# Altium PCB Electrode_Ribbon_PCB_v3.0.PcbDoc (part 2 of 5)
Units mil, origin at the board's own origin, x right, y up, seen from the top; angles counter-clockwise.
Board outline 8303.83 x 5482.84 mil, 2 copper layers (Top Layer, Bottom Layer), stack 3.556 mil thick; 265 components, 171 nets, 720 pads, 346 vias.
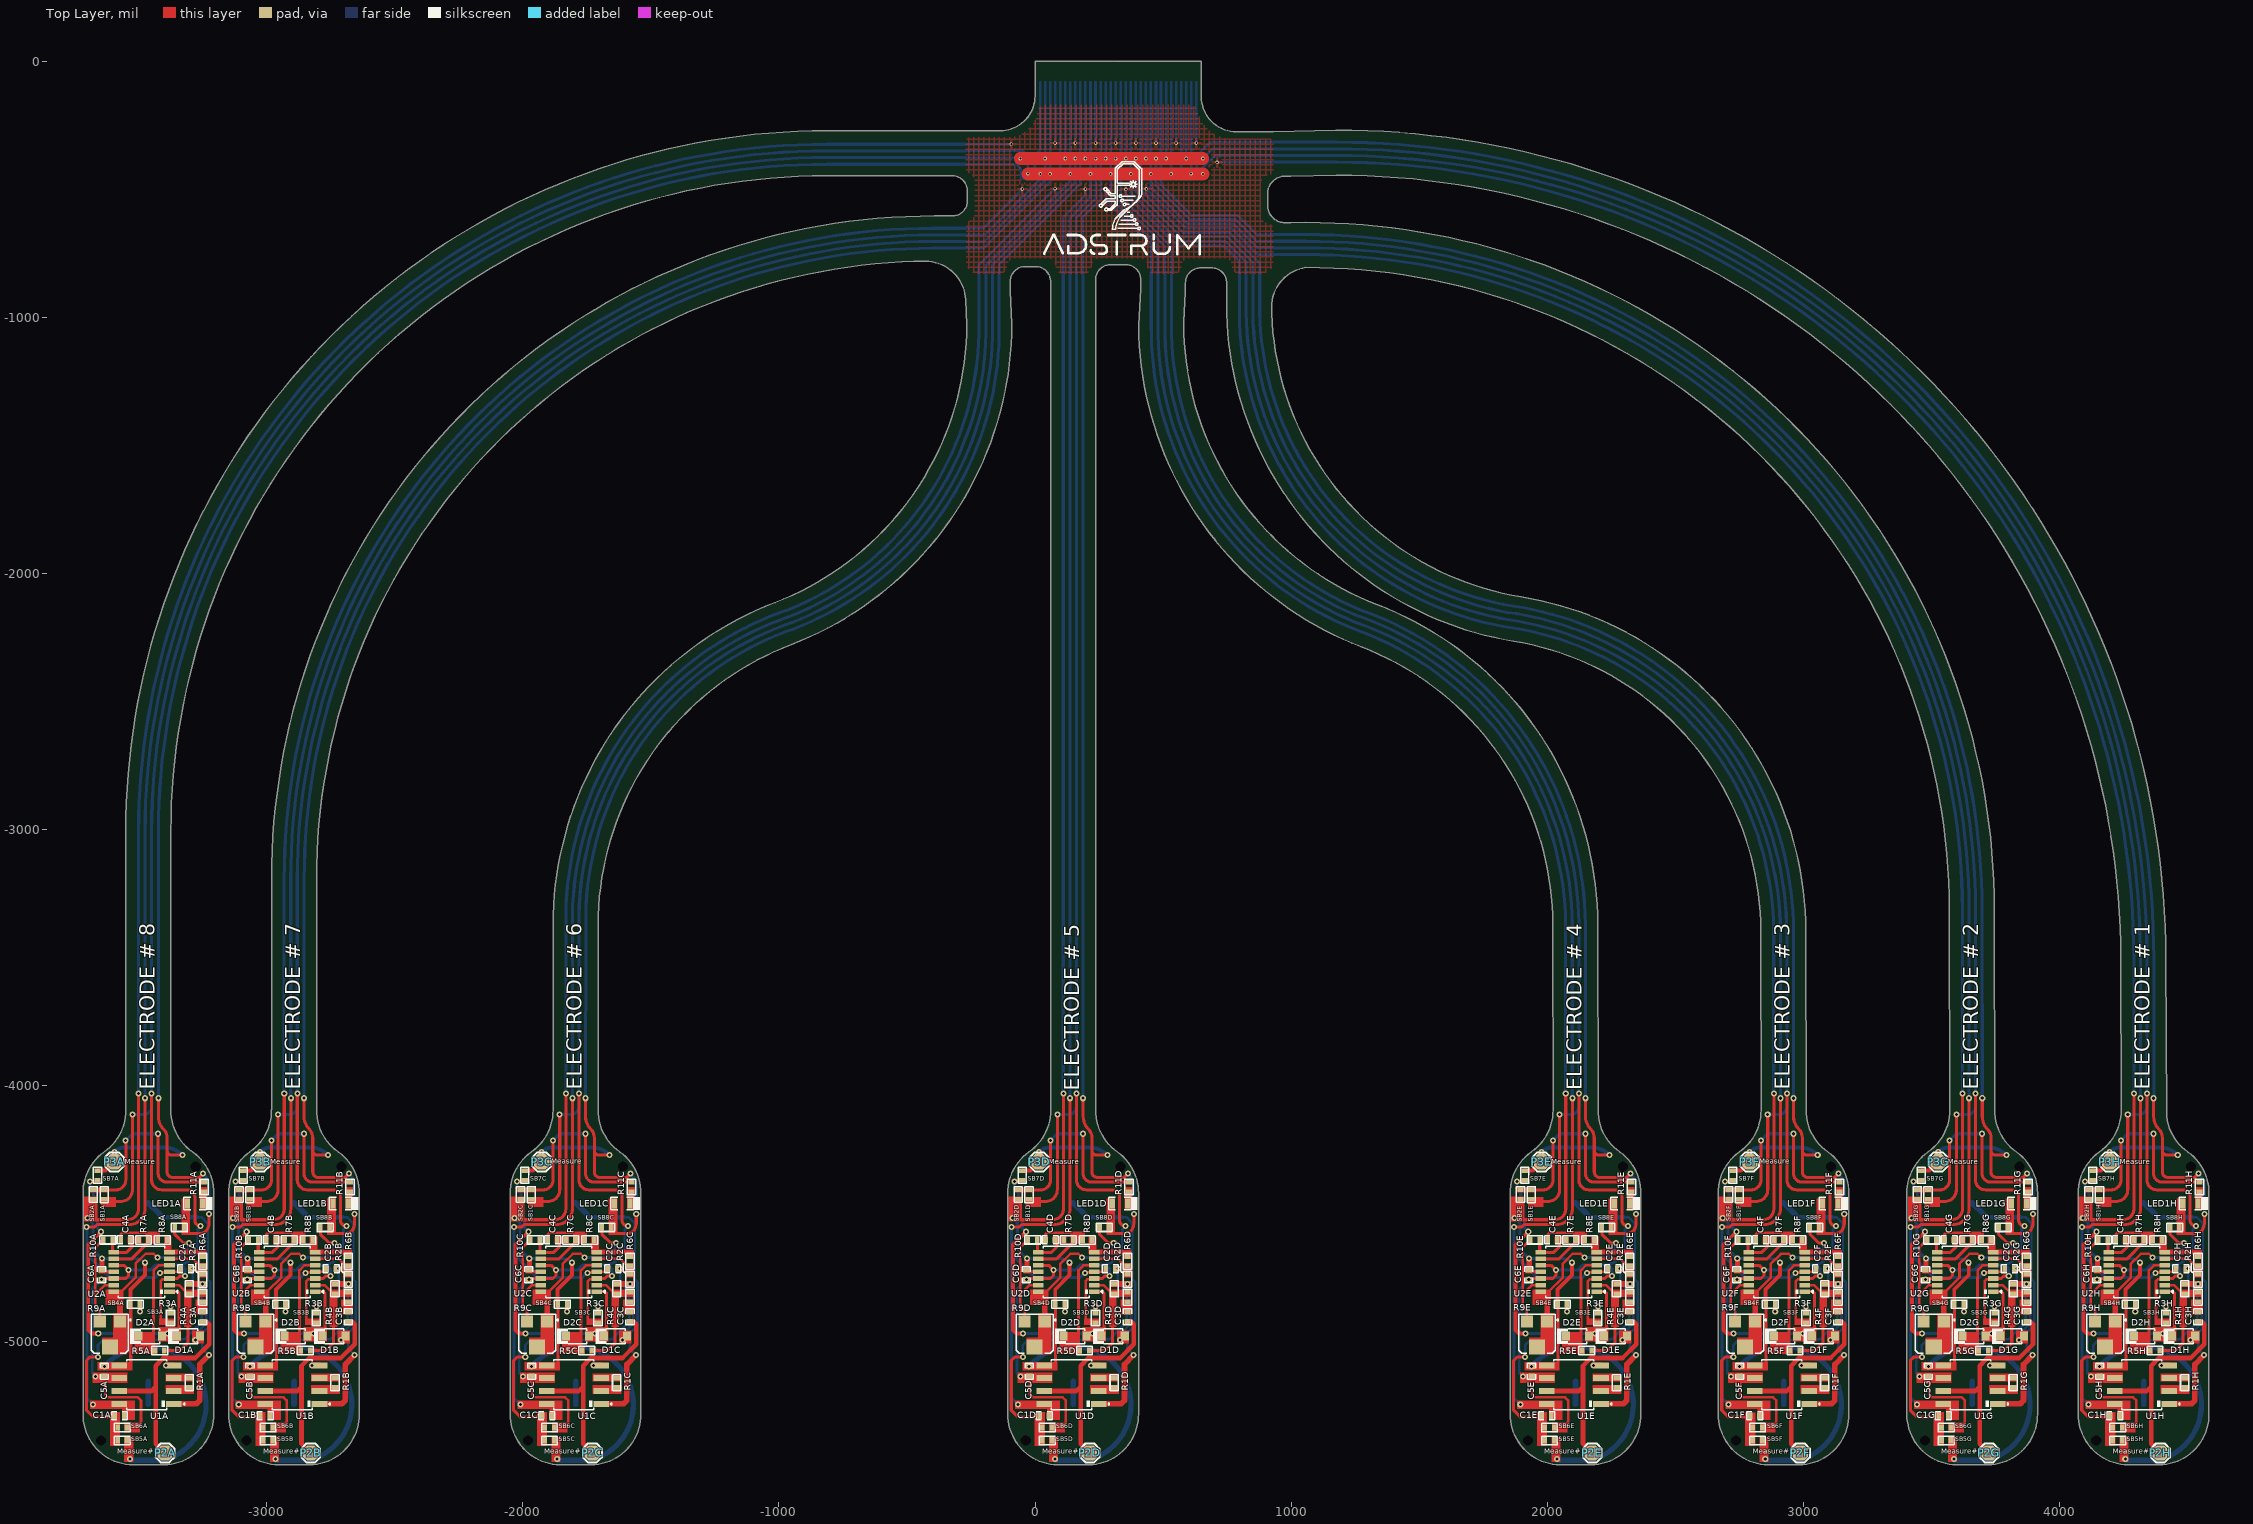
[diagram p0: Top Layer view]

## Part data (continued)
R10A R10B R10C R10D R10E R10F R10G R10H R11A R11B R11C R11D R11E R11F R11G R11H: library part RC0402JR-071KL, "RES 1K OHM 5% 1/16W 0402", Case Code (Imperial)=0402, Case Code (Metric)=1005, LCSC Part Number=C105637, Manufacturer=Yageo, Max Operating Temperature=155°C, Max Power Dissipation=63mW, Min Operating Temperature=-55°C, Package Quantity=1, Power Rating=62.5mW, Resistance=1kR, Resistance Tolerance=5%, Resistor Type="Thick Film", Supplier Part Number 1=311-1.0KJRCT-ND, Temperature Coefficient=100ppm/°C, Voltage Rating=50V, Case/Package=0402, Category="Chip SMD Resistors", ComponentLink1Description=https://datasheet.ciiva.com/7983/1018594-7983558.pdf?src-supplier=Element14, ComponentLink1URL=https://datasheet.ciiva.com/7983/1018594-7983558.pdf?src-supplier=Element14, ComponentLink2Description=https://datasheet.ciiva.com/2452/pyu-r-int-thick-7-2452756.pdf?src-supplier=Digi-Key, ComponentLink2URL=https://datasheet.ciiva.com/2452/pyu-r-int-thick-7-2452756.pdf?src-supplier=Digi-Key, ComponentLink3Description=https://datasheet.ciiva.com/2452/pyu-r-int-thick-7-2452757.pdf?src-supplier=Digi-Key, ComponentLink3URL=https://datasheet.ciiva.com/2452/pyu-r-int-thick-7-2452757.pdf?src-supplier=Digi-Key, ComponentLink4Description=https://datasheet.ciiva.com/2452/pyu-r-int-thick-7-2452755.pdf?src-supplier=Digi-Key, ComponentLink4URL=https://datasheet.ciiva.com/2452/pyu-r-int-thick-7-2452755.pdf?src-supplier=Digi-Key, ComponentLink5Description=https://datasheet.ciiva.com/7850/1018594-7850170.pdf?src-supplier=Element14, ComponentLink5URL=https://datasheet.ciiva.com/7850/1018594-7850170.pdf?src-supplier=Element14, ComponentLink6Description=https://datasheet.ciiva.com/7850/1018594-7850171.pdf?src-supplier=Element14, ComponentLink6URL=https://datasheet.ciiva.com/7850/1018594-7850171.pdf?src-supplier=Element14, ComponentLink7Description=https://datasheet.ciiva.com/17081/pyu-rc0402-51-rohs-l-6-r-17081438.pdf?src-supplier=Future+Electronics, ComponentLink7URL=https://datasheet.ciiva.com/17081/pyu-rc0402-51-rohs-l-6-r-17081438.pdf?src-supplier=Future+Electronics, Construction=Rectangular, Depth=0.5mm, Features="Moisture Resistant", Height=0.016inch, Item Type=Resistor, Lead Free="Lead Free", Length=0.039inch, Manufacturer Part Number=RC0402JR-071KL, Military Standard=Not, Number of Terminations=2, Packaging="Tape and Reel", Pricing 1="1=0.10000, 10=0.01300, 100=0.00540, 1000=0.00244, 2500=0.00212, 5000=0.00175 (USD)", REACH SVHC="No SVHC", RoHS=Yes, RoHS Compliant=Yes, Series=RC, Size Code=0402, Stock 1=452315, Supplier 1=Digi-Key, Termination=SMD/SMT, Tolerance=5%, Width=0.02inch
SB1A SB1B SB1C SB1D SB1E SB1F SB1G SB1H SB2A SB2B SB2C SB2D SB2E SB2F SB2G SB2H SB3A SB3B SB3C SB3D SB3E SB3F SB3G SB3H SB4A SB4B SB4C SB4D SB4E SB4F SB4G SB4H SB5A SB5B SB5C SB5D SB5E SB5F SB5G SB5H SB6A SB6B SB6C SB6D SB6E SB6F SB6G SB6H SB7A SB7B SB7C SB7D SB7E SB7F SB7G SB7H SB8A SB8B SB8C SB8D SB8E SB8F SB8G SB8H: "Solder Bridge ON"
U1A U1B U1C U1D U1E U1F U1G U1H: "IC OPAMP INSTR 825KHZ 8SOIC", Case/Package=SOIC, Input Bias Current=1.5nA, Input Offset Voltage (Vos)=60uV, Input Resistance=100GR, LCSC Part Number=C13342, Manufacturer="Analog Devices", Max Dual Supply Voltage=18V, Max Operating Temperature=85°C, Max Power Dissipation=200mW, Min Dual Supply Voltage=2.3V, Min Operating Temperature=-40°C, Nominal Supply Current=1mA, Operating Supply Voltage=36V, Output Current per Channel=18mA, Package Quantity=1000, Power Supply Rejection Ratio (PSRR)=130dB, Quiescent Current=900uA, Supplier Part Number 1=584-AD8221ARZ-R7, Voltage Gain=60dB, -3db Bandwidth=825kHz, Bandwidth=562kHz, Category="Amplifiers - Op Amps, Buffer, Instrumentation", Common Mode Rejection Ratio=80dB, ComponentLink1Description=https://datasheet.ciiva.com/15128/getdatasheetpartid-313520-15128733.pdf?src-supplier=Verical, ComponentLink1URL=https://datasheet.ciiva.com/15128/getdatasheetpartid-313520-15128733.pdf?src-supplier=Verical, ComponentLink2Description=https://datasheet.ciiva.com/2975/ad8221-2975658.pdf?src-supplier=Avnet, ComponentLink2URL=https://datasheet.ciiva.com/2975/ad8221-2975658.pdf?src-supplier=Avnet, ComponentLink3Description=https://datasheet.ciiva.com/2975/ad8221-2975980.pdf?src-supplier=Avnet, ComponentLink3URL=https://datasheet.ciiva.com/2975/ad8221-2975980.pdf?src-supplier=Avnet, ComponentLink4Description=https://datasheet.ciiva.com/6628/ad8221-6628618.pdf?src-supplier=Digi-Key, ComponentLink4URL=https://datasheet.ciiva.com/6628/ad8221-6628618.pdf?src-supplier=Digi-Key, ComponentLink5Description=https://datasheet.ciiva.com/6628/ad8221-6628619.pdf?src-supplier=Digi-Key, ComponentLink5URL=https://datasheet.ciiva.com/6628/ad8221-6628619.pdf?src-supplier=Digi-Key, ComponentLink6Description=https://datasheet.ciiva.com/6628/ad8221-6628617.pdf?src-supplier=Digi-Key, ComponentLink6URL=https://datasheet.ciiva.com/6628/ad8221-6628617.pdf?src-supplier=Digi-Key, ComponentLink7Description=https://datasheet.ciiva.com/48709/001249009-da-01-en-ic-amp-inst-prec-ad8221arz-r7-soic-8-adi-48709526.pdf?src-supplier=Conrad, ComponentLink7URL=https://datasheet.ciiva.com/48709/001249009-da-01-en-ic-amp-inst-prec-ad8221arz-r7-soic-8-adi-48709526.pdf?src-supplier=Conrad, Contact Plating=Tin,Matte, Item Type=IC, Lead Free="Contains Lead", Manufacturer Part Number=AD8221ARZ-R7, Number of Channels=1, Number of Circuits=1, Number of Elements=1, Number of Pins=8, Operating Supply Current=1mA, Packaging="Tape and Reel", Power Dissipation=200mW, Pricing 1="1=7.37000, 10=6.66000, 25=6.35000, 50=6.35000, 100=5.51000, 250=5.27000, 500=4.80000, 1000=4.37000, 10000=4.37000 (USD)", Radiation Hardening=No, RoHS=Yes, RoHS Compliant=Yes, Series=-, Slew Rate=2.5V/µs, Supplier 1=Mouser, Supply Current=1mA
U2A U2B U2C U2D U2E U2F U2G U2H: "IC OPAMP JFET 4 CIRCUIT 14TSSOP", Case/Package=TSSOP, Input Bias Current=400pA, Input Offset Voltage (Vos)=15mV, Manufacturer="Texas Instruments", Max Dual Supply Voltage=18V, Max Operating Temperature=125°C, Max Power Dissipation=680mW, Min Dual Supply Voltage=3.5V, Min Operating Temperature=-40°C, Min Supply Voltage=7V, Nominal Supply Current=11.2mA, Operating Supply Current=1.4mA, Package Quantity=1, Quiescent Current=2.8A, Supplier Part Number 1=595-TL084CPWR, Voltage Gain=106.02dB, Bandwidth=3MHz, Category="Amplifiers - Op Amps, Buffer, Instrumentation", Common Mode Rejection Ratio=70dB, ComponentLink1Description=https://datasheet.ciiva.com/34301/1064719-34301936.pdf?src-supplier=Jameco, ComponentLink1URL=https://datasheet.ciiva.com/34301/1064719-34301936.pdf?src-supplier=Jameco, ComponentLink2Description=https://datasheet.ciiva.com/1795/tl081a-1795644.pdf?src-supplier=Digi-Key, ComponentLink2URL=https://datasheet.ciiva.com/1795/tl081a-1795644.pdf?src-supplier=Digi-Key, ComponentLink3Description=https://datasheet.ciiva.com/1795/tl081a-1795643.pdf?src-supplier=Digi-Key, ComponentLink3URL=https://datasheet.ciiva.com/1795/tl081a-1795643.pdf?src-supplier=Digi-Key, ComponentLink4Description=https://datasheet.ciiva.com/1795/tl081a-1795645.pdf?src-supplier=Digi-Key, ComponentLink4URL=https://datasheet.ciiva.com/1795/tl081a-1795645.pdf?src-supplier=Digi-Key, ComponentLink5Description=https://datasheet.ciiva.com/14459/tl082-14459749.pdf?src-supplier=Avnet, ComponentLink5URL=https://datasheet.ciiva.com/14459/tl082-14459749.pdf?src-supplier=Avnet, ComponentLink6Description=https://datasheet.ciiva.com/48707/001072249-da-01-en-ic-opamp-jfet-3mh-tl084cpwr-tssop-14-tid-48707867.pdf?src-supplier=Conrad, ComponentLink6URL=https://datasheet.ciiva.com/48707/001072249-da-01-en-ic-opamp-jfet-3mh-tl084cpwr-tssop-14-tid-48707867.pdf?src-supplier=Conrad, Contact Plating=Gold, Gain Bandwidth Product=3MHz, Lead Free="Lead Free", Manufacturer Part Number=TL084CPWR, Max I/O Voltage=15mV, Max Supply Voltage=18V, Nominal Gain Bandwidth Product=3MHz, Number of Amplifiers=4, Number of Channels=4, Number of Circuits=4, Number of Elements=4, Number of Pins=14, Packaging="Tape and Reel", Pricing 1="1=0.64000, 10=0.54500, 50=0.54500, 100=0.37800, 500=0.32000, 1000=0.24700, 2000=0.22500, 10000=0.22500 (USD)", Radiation Hardening=No, REACH SVHC="No SVHC", RoHS=Yes, RoHS Compliant=Yes, Slew Rate=13V/µs, Stock 1=3, Supplier 1=Mouser, Unity Gain Bandwidth Product=3MHz

## Free pads (board coordinates)
  round 0 hole 39.37 unplated: MH1(-3648.38,-5388.05) MH1(-3079.41,-5388.05) MH1(-1979.62,-5388.05) MH1(-36.14,-5388.05) MH1(1926.03,-5388.05) MH1(2738.74,-5388.06) MH1(3475.49,-5388.05) MH1(4144.96,-5388.05) MH2(-3277.89,-4318.78) MH2(-2708.92,-4318.78) MH2(-1609.13,-4318.78) MH2(334.35,-4318.78) MH2(2296.52,-4318.78) MH2(3109.23,-4318.79) MH2(3845.98,-4318.78) MH2(4515.45,-4318.78)

## Via types
v1: diameter 23.62, hole 11.81, Top Layer to Bottom Layer, tented both sides, 304 vias
v2: diameter 13.78, hole 7.87, Top Layer to Bottom Layer, 42 vias

## Nets (pads, with @x,y where several pads share a name; then routed paths per layer and width w, separated by ;. In a path a pad name is that pad's centre, name@x,y a point inside that pad or via, vN(x,y) a via of type N, cw(c..) or ccw(c..) an arc to the next point about the centre after c; other vN are vias at no path point)
#rgA: R1A.2 U1A.2
#rgB: R1B.2 U1B.2
#rgC: R1C.2 U1C.2
#rgD: R1D.2 U1D.2
#rgE: R1E.2 U1E.2
#rgF: R1F.2 U1F.2
#rgG: R1G.2 U1G.2
#rgH: R1H.2 U1H.2
*rgA: R1A.1 U1A.3
*rgB: R1B.1 U1B.3
*rgC: R1C.1 U1C.3
*rgD: R1D.1 U1D.3
*rgE: R1E.1 U1E.3
*rgF: R1F.1 U1F.3
*rgG: R1G.1 U1G.3
*rgH: R1H.1 U1H.3